# Altium PCB MiniPC.PcbDoc (part 18 of 24)
Units mm, origin at the board's own origin, x right, y up, seen from the top; angles counter-clockwise.
Board outline 175 x 155 mm, 16 copper layers (1_Top, 2_int1_(gnd), 3_int2_(power), 4_int3_(gnd), 5_int4_(sign), 6_int5_(power), 7_int6_(sign), 8_int7_(power), 9_int8_(gnd), 10_int9_(sign), 11_int10_(gnd), 12_int11_(sign), 13_int12_(gnd), 14_int13_(power), 15_int14_(gnd), 16_Bottom), stack 2.008 mm thick; 1046 components, 837 nets, 6010 pads, 4009 vias.
Unrouted connection lines stored in the file: 564.
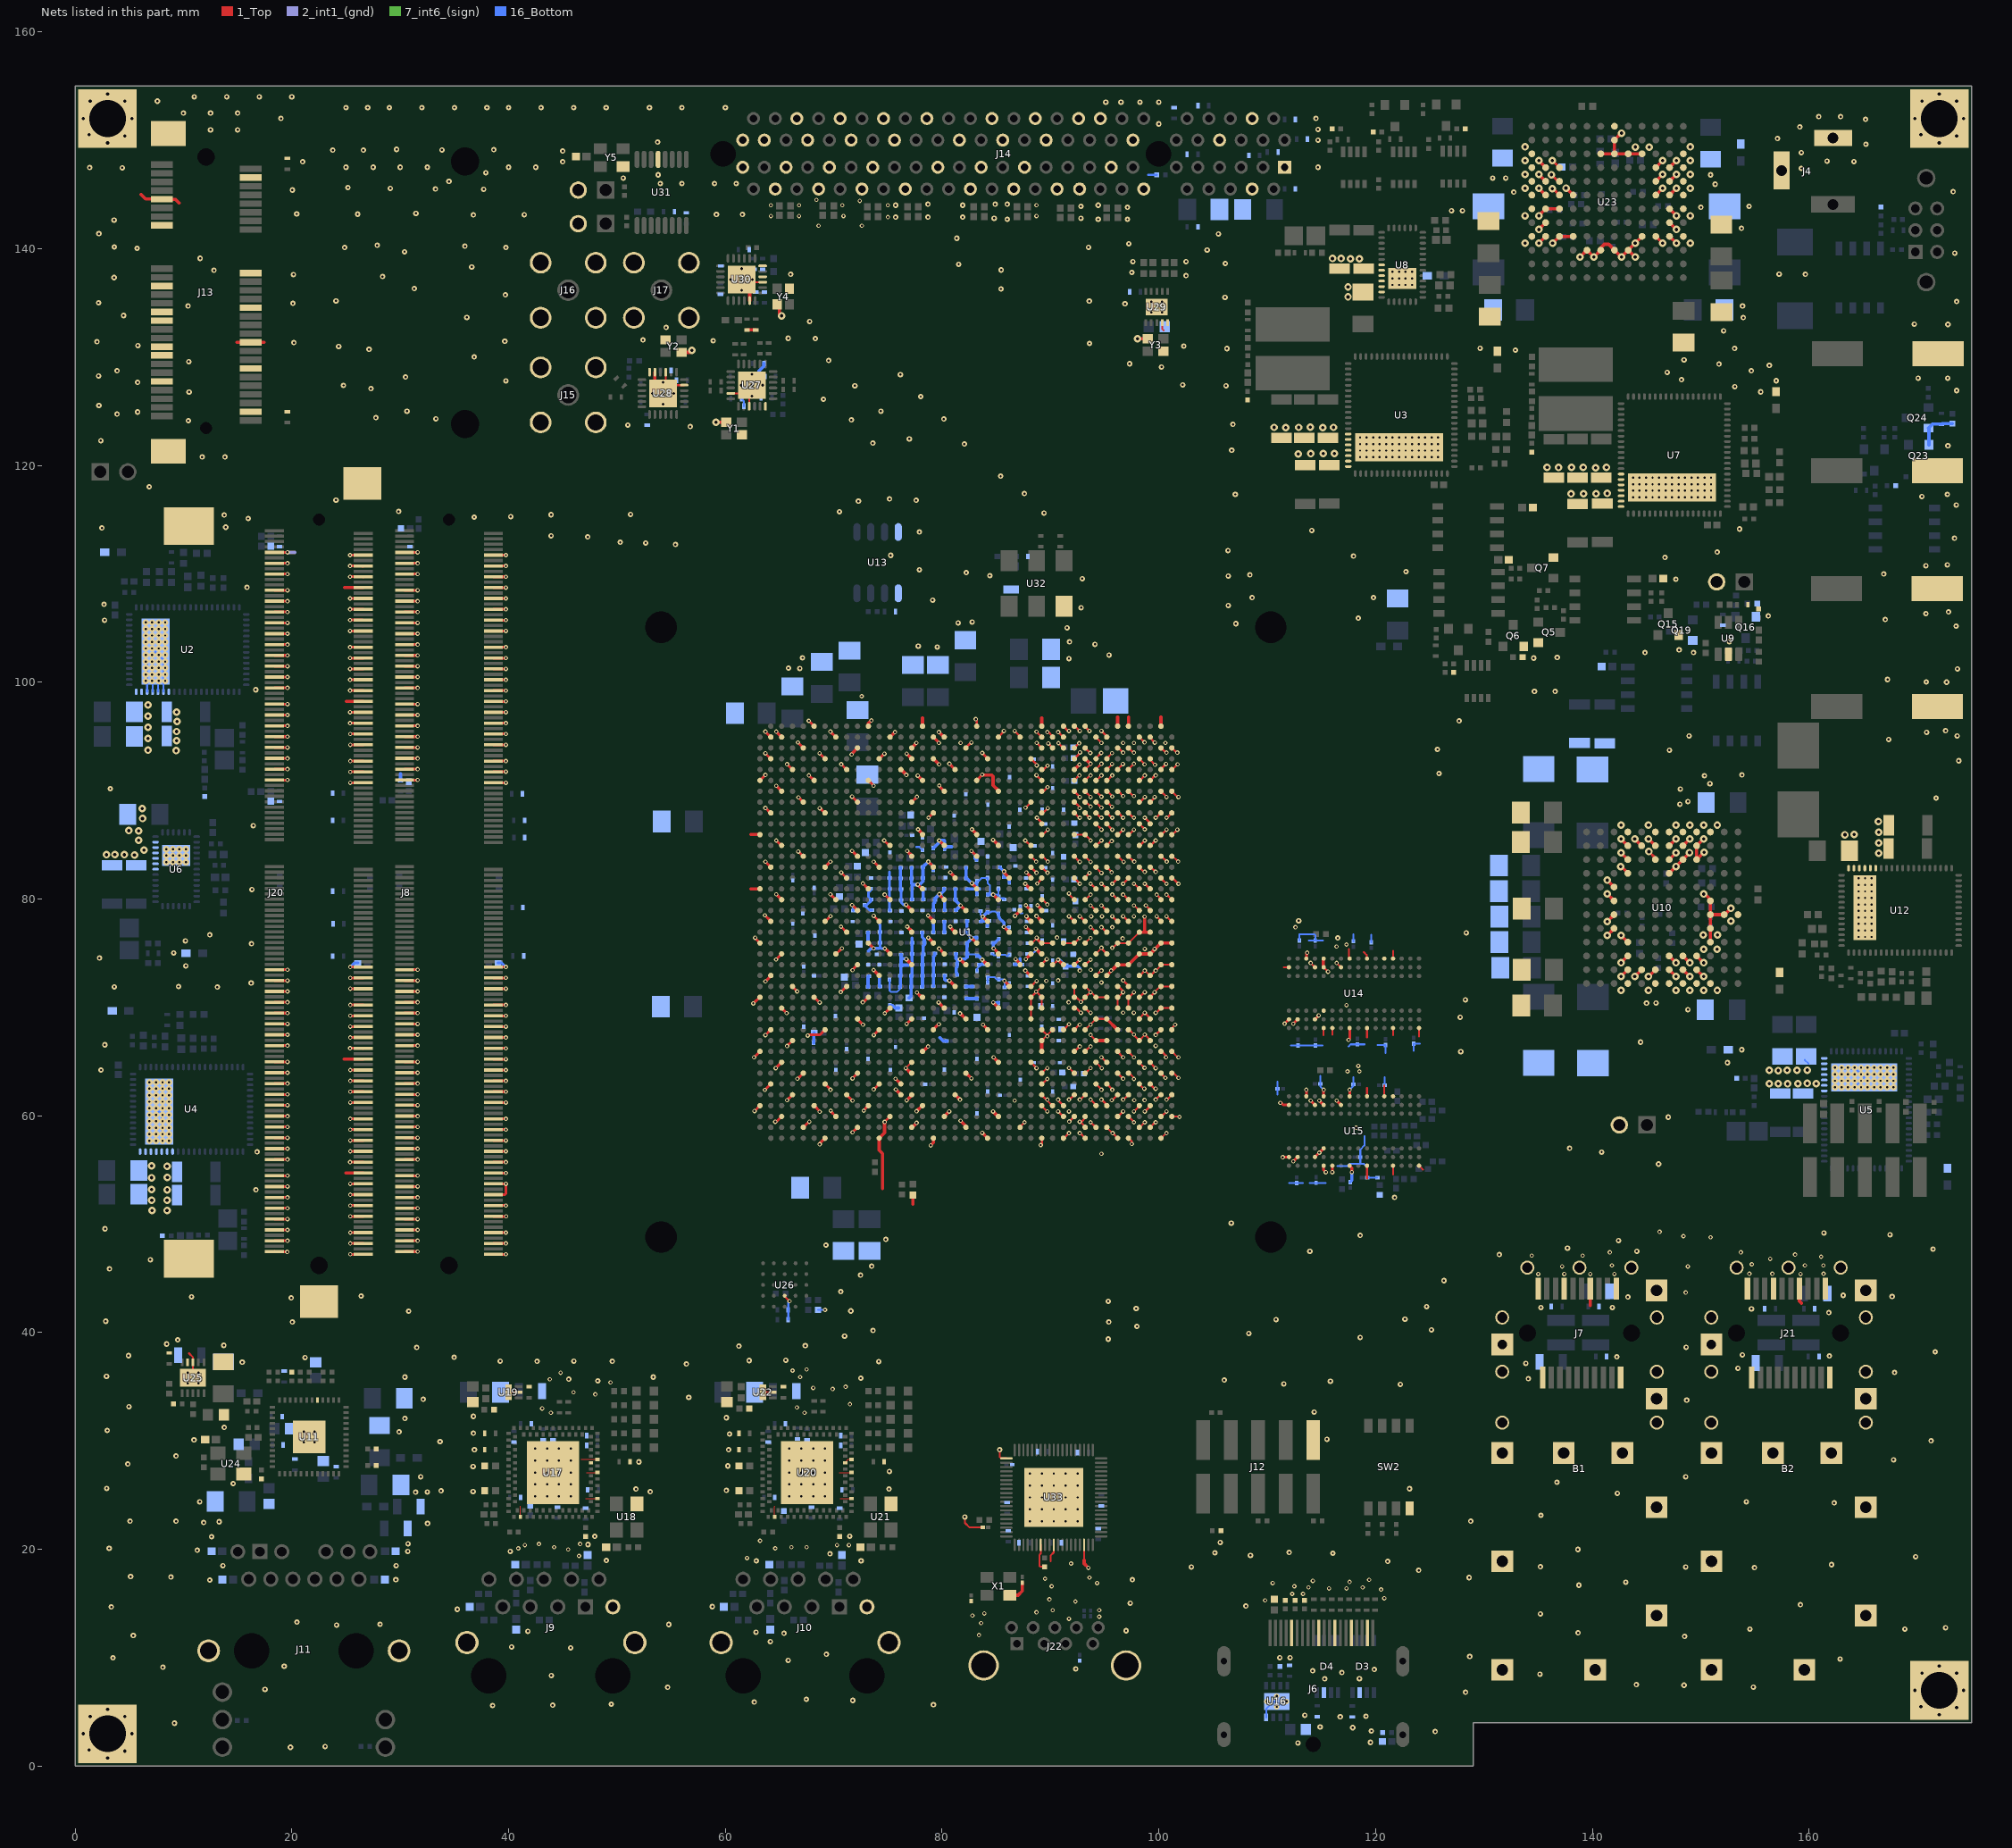
[diagram p30: the nets of this part, all layers, seen from the top]

## Via types
v1: diameter 0.4, hole 0.2, 1_Top to 16_Bottom, tented both sides, 1658 vias
v2: diameter 0.5, hole 0.2, 1_Top to 16_Bottom, tented both sides, 1014 vias
v3: diameter 0.7, hole 0.3, 1_Top to 16_Bottom, tented both sides, 915 vias
v4: diameter 0.6, hole 0.2, 1_Top to 16_Bottom, tented both sides, 278 vias
v5: diameter 0.4, hole 0.2, 1_Top to 16_Bottom, 93 vias
v6: diameter 0.4/0/0/0/0/0/0/0/0/0/0/0/0/0/0/0.4 (per signal layer), hole 0.2, 1_Top to 16_Bottom, tented both sides, 18 vias
v7: diameter 0.4/0/0/0/0/0/0/0/0/0/0/0.4/0.4/0.4/0.4/0.4 (per signal layer), hole 0.2, 1_Top to 16_Bottom, tented both sides, 16 vias
v8: diameter 0.5, hole 0.254, 1_Top to 16_Bottom, tented both sides, 15 vias
v9: diameter 0.5, hole 0.2, 1_Top to 16_Bottom, 2 vias

## Nets (pads, with @x,y where several pads share a name; then routed paths per layer and width w, separated by ;. In a path a pad name is that pad's centre, name@x,y a point inside that pad or via, vN(x,y) a via of type N, cw(c..) or ccw(c..) an arc to the next point about the centre after c; other vN are vias at no path point) (continued)
GND: B1.MH1 B1.MH2 B1.MH3 B1.MH4 B1.MH5 B1.MH6 B1.MH7 B1.MH8 B1.MH9 B1.MH10 B1.MH11 B1.MH12 B1.MH13 B1.MH14 B1.MH15 B1.MH16 B1.MH17 B1.MH18 B1.MH19 B1.MH20 B2.MH1 B2.MH2 B2.MH3 B2.MH4 B2.MH5 B2.MH6 B2.MH7 B2.MH8 B2.MH9 B2.MH10 B2.MH11 B2.MH12 B2.MH13 B2.MH14 B2.MH15 B2.MH16 B2.MH17 B2.MH18 B2.MH19 B2.MH20 C2.1 C3.1 C9.1 C10.1 C11.1 C12.1 C18.1 C19.1 C20.1 C21.1 C22.1 C28.1 C29.1 C30.1 C31.1 C37.1 C38.1 C39.1 C40.1 C45.1 C46.1 C47.1 C52.1 C53.1 C54.1 C55.1 C56.1 C61.1 C62.1 C63.1 C67.1 C68.1 C69.1 C70.1 C71.1 C72.1 C74.2 C75.2 C76.2 C77.2 C79.1 C80.2 C81.2 C82.1 C83.1 C84.1 C85.1 C86.1 C87.2 C88.2 C89.1 C90.1 C91.1 C92.1 C93.1 C95.2 C96.1 C97.1 C98.1 C99.1 C100.1 C101.2 C102.1 C103.1 C104.1 C105.1 C112.1 C113.1 C116.1 C118.1 C119.1 C120.1 C121.1 C122.1 C123.1 C124.1 C125.1 C126.1 C127.1 C128.1 C129.1 C130.1 C131.1 C132.1 C133.1 C134.1 C135.1 C136.1 C137.1 C138.1 C139.1 C140.1 C141.1 C142.1 C143.1 C144.1 C145.1 C146.1 C147.1 C148.1 C149.1 C150.1 C151.1 C152.1 C153.1 C154.1 C155.1 C156.1 C157.1 C158.1 C159.1 C160.1 C161.1 C162.1 C163.1 C164.1 C165.1 C166.1 C167.1 C168.1 C169.1 C170.1 C171.1 C172.1 C173.1 C174.1 C175.1 C176.1 C177.1 C178.1 C179.1 C180.1 C181.1 C182.1 C183.1 C184.1 C185.1 C186.1 C187.1 C188.1 C189.1 C190.1 C191.1 C192.1 C193.1 C194.1 C195.1 C196.1 C197.1 C198.1 C199.1 C200.1 C201.1 C202.1 C203.1 C204.1 C205.1 C206.1 C207.1 C208.1 C209.1 C210.1 C211.1 C212.1 C213.1 C214.1 C215.1 C216.1 C217.1 C218.1 C219.1 C220.1 C221.1 C222.1 C223.1 C224.1 C225.1 C226.1 C227.1 C228.1 C229.1 C230.1 C231.1 C232.1 C233.1 C234.1 C235.1 C236.1 C237.1 C238.1 C239.1 C240.1 C241.1 C242.1 C243.1 C244.1 C245.1 C246.1 C247.1 C248.1 C249.1 C250.1 C251.1 C252.1 C253.1 C254.1 C255.1 C256.1 C257.1 C258.1 C259.1 C260.1 C261.1 C262.1 C263.1 C264.1 C265.1 C266.1 C267.1 C268.1 C269.1 C270.1 C271.1 C272.1 C273.1 C274.1 C275.1 C276.1 C277.1 C278.1 C279.1 C280.1 C281.1 C282.1 C283.2 C284.2 C285.2 C286.2 C287.2 C288.1 C289.2 C290.2 C291.2 C292.2 C293.2 C294.2 C295.2 C296.2 C297.2 C298.1 C299.1 C300.1 C308.1 C310.2 C311.2 C312.2 C314.2 C318.1 C319.1 C320.1 C321.1 C322.1 C323.1 C324.1 C325.1 C326.1 C327.1 C328.1 C329.1 C330.1 C331.1 C332.1 C333.1 C334.1 C335.1 C336.2 C337.2 C338.2 C340.2 C344.1 C345.1 C346.1 C347.1 C348.1 C349.1 C350.1 C351.1 C352.1 C353.1 C354.1 C355.1 C356.1 C357.1 C358.1 C359.1 C360.1 C361.1 C362.1 C363.1 C364.1 C365.1 C366.1 C367.1 C368.1 C369.1 C370.1 C371.1 C372.1 C373.1 C374.1 C375.1 C376.1 C377.1 C378.1 C379.1 C380.1 C381.1 C382.1 C383.1 C384.1 C385.1 C386.1 C387.2 C388.1 C389.1 C390.2 C391.1 C392.1 C393.1 C394.1 C395.1 C396.1 C397.1 C398.1 C399.1 C400.1 C401.1 C402.1 C403.1 C404.1 C405.1 C406.1 C407.1 C408.1 C409.1 C410.1 C411.1 C412.1 C413.1 C414.1 C415.1 C416.1 C417.1 C418.1 C419.1 C420.1 C421.1 C422.1 C423.1 C424.1 C425.1 C426.1 C427.1 C428.1 C429.1 C430.1 C431.1 C432.1 C433.1 C434.1 C435.1 C436.1 C437.1 C438.1 C439.1 C440.1 C441.1 C442.1 C443.1 C444.1 C445.1 C446.1 C447.1 C448.1 C449.1 C450.1 C451.1 C452.1 C453.1 C454.1 C455.1 C456.1 C457.1 C458.1 C459.1 C460.1 C461.1 C462.1 C463.1 C464.1 C465.1 C466.1 C467.1 C468.1 C469.1 C470.1 C471.1 C472.1 C473.1 C474.1 C475.1 C476.1 C477.1 C478.1 C479.1 C480.1 C481.1 C482.2 C483.1 C500.1 C501.1 C502.1 C503.1 C504.1 C505.1 C506.1 C507.1 C508.1 C509.1 C510.2 C511.2 C512.2 C513.2 C514.2 C515.2 C525.2 C526.2 C527.2 C528.2 C529.2 C530.2 C532.1 C533.1 C534.1 C535.1 C536.1 C537.1 C538.1 C539.1 C540.1 C541.1 C542.1 C543.1 C546.1 C547.1 C548.1 C549.1 C550.1 C551.1 C552.1 C553.1 C554.1 C555.1 C556.1 C557.1 C558.1 C559.1 C562.1 C563.1 C564.1 C565.1 C566.1 C567.1 C568.1 C569.2 C570.1 C571.1 C572.1 C573.1 C574.1 D3.7 D4.7 J3.2 J4.2 J4.3 J5.2 J6.2 J6.5 J6.8 J6.11 J6.16 J7.1 J7.10 J7.11 J7.14 J7.17 J7.20 J8.1 J8.2 J8.5 J8.6 J8.9 J8.10 J8.14 J8.15 J8.18 J8.19 J8.22 J8.23 J8.26 J8.27 J8.30 J8.31 J8.35 J8.36 J8.39 J8.40 J8.43 J8.44 J8.47 J8.48 J8.51 J8.52 J8.56 J8.57 J8.60 J8.61 J8.64 J8.65 J8.68 J8.69 J8.72 J8.73 J8.77 J8.78 J8.81 J8.82 J8.85 J8.86 J8.89 J8.90 J8.93 J8.94 J8.98 J8.99 J8.102 J8.103 J8.106 J8.107 J8.167 J8.168 J8.171 J8.172 J8.175 J8.176 J8.180 J8.181 J8.184 J8.185 J8.188 J8.189 J8.192 J8.193 J8.196 J8.197 J8.201 J8.202 J8.205 J8.206 J8.209 J8.210 J8.213 J8.214 J8.217 J8.218 J8.222 J8.223 J8.226 J8.227 J8.230 J8.231 J8.234 J8.235 J8.238 J8.239 J8.243 J8.244 J8.247 J8.248 J8.251 J8.252 J8.MP1 J8.MP2 J9.10 J9.S1 J9.S2 J10.10 J10.S1 J10.S2 J11.S1 J11.S2 J12.10 J13.4 J13.9 J13.15 J13.18 J13.21 J13.26 J13.27 J13.29 J13.34 J13.35 J13.37 J13.40 J13.43 J13.50 J13.MP1 J13.MP2 J14.A1 J14.A4 J14.A12 J14.A15 J14.A18 J14.A20 J14.A23 J14.A24 J14.A27 J14.A28 J14.A31 J14.A34 J14.A37 J14.A38 J14.A41 J14.A42 J14.A45 J14.A46 J14.A49 J14.B4 J14.B7 J14.B13 J14.B16 J14.B18 J14.B21 J14.B22 J14.B25 J14.B26 J14.B29 J14.B32 J14.B35 J14.B36 J14.B39 J14.B40 J14.B43 J14.B44 J14.B47 J14.B49 J15.2 J15.3 J15.4 J15.5 J16.2 J16.3 J16.4 J16.5 J17.2 J17.3 J17.4 J17.5 J18.2 J19.2 J20.1 J20.2 J20.5 J20.6 J20.9 J20.10 J20.14 J20.15 J20.18 J20.19 J20.22 J20.23 J20.26 J20.27 J20.30 J20.31 J20.35 J20.36 J20.39 J20.40 J20.43 J20.44 J20.47 J20.48 J20.51 J20.52 J20.56 J20.57 J20.60 J20.61 J20.64 J20.65 J20.68 J20.69 J20.72 J20.73 J20.77 J20.78 J20.81 J20.82 J20.85 J20.86 J20.89 J20.90 J20.93 J20.94 J20.98 J20.99 J20.102 J20.103 J20.106 J20.107 J20.167 J20.168 J20.171 J20.172 J20.175 J20.176 J20.180 J20.181 J20.184 J20.185 J20.188 J20.189 J20.192 J20.193 J20.196 J20.197 J20.201 J20.202 J20.205 J20.206 J20.209 J20.210 J20.213 J20.214 J20.217 J20.218 J20.222 J20.223 J20.226 J20.227 J20.230 J20.231 J20.234 J20.235 J20.238 J20.239 J20.243 J20.244 J20.247 J20.248 J20.251 J20.252 J20.MP1 J20.MP2 J21.1 J21.10 J21.11 J21.14 J21.17 J21.20 J22.10 J22.11 L1.1 L2.1 L3.1 L4.1 L5.1 L6.1 L7.1 L8.1 L9.1 L10.1 MH1.MH1 MH2.MH1 MH3.MH1 MH4.MH1 Q5.2 Q6.2 Q7.2 Q15.2 Q16.2 Q19.2 Q23.2 Q24.2 R3.1 R9.1 R16.1 R17.1 R20.1 R30.1 R40.1 R58.1 R72.1 R94.1 R119.1 R121.1 R131.1 R137.1 R140.1 R157.2 R184.2 R185.2 R186.2 R187.2 R188.2 R189.2 R190.2 R191.2 R192.2 R193.2 R194.1 R223.1 R228.1 R230.1 R231.1 R233.1 R235.1 R236.1 R237.1 R243.2 R244.1 R245.1 R246.1 R247.1 R248.1 R257.1 R258.1 R264.2 R265.2 R272.1 R281.1 R282.1 R288.2 R289.2 R295.1 R299.2 R304.2 R307.2 R309.2 R315.1 R322.1 R323.1 R328.1 R332.2 R342.2 SW2.8 U1.A6 U1.A11 U1.A16 U1.A21 U1.A27 U1.A29 U1.A30 U1.A31 U1.A34 U1.A35 U1.A38 U1.AA1 U1.AA11 U1.AA17 U1.AA21 U1.AA26 U1.AA27 U1.AA28 U1.AA29 U1.AA30 U1.AA31 U1.AA34 U1.AA35 U1.AA38 U1.AA39 U1.AB3 U1.AB8 U1.AB13 U1.AB18 U1.AB23 U1.AB26 U1.AB27 U1.AB32 U1.AB33 U1.AB36 U1.AB37 U1.AC10 U1.AC15 U1.AC20 U1.AC22 U1.AC25 U1.AC27 U1.AC28 U1.AC29 U1.AC30 U1.AC31 U1.AC34 U1.AC35 U1.AC38 U1.AC39 U1.AD2 U1.AD12 U1.AD26 U1.AD32 U1.AD33 U1.AD36 U1.AD37 U1.AE4 U1.AE9 U1.AE19 U1.AE24 U1.AE26 U1.AE27 U1.AE30 U1.AE31 U1.AE34 U1.AE35 U1.AE38 U1.AE39 U1.AF1 U1.AF6 U1.AF11 U1.AF16 U1.AF26 U1.AF27 U1.AF30 U1.AF31 U1.AF32 U1.AF33 U1.AF34 U1.AF35 U1.AF36 U1.AF37 U1.AG3 U1.AG13 U1.AG18 U1.AG23 U1.AG26 U1.AG27 U1.AG30 U1.AG31 U1.AG34 U1.AG35 U1.AG38 U1.AG39 U1.AH10 U1.AH15 U1.AH20 U1.AH26 U1.AH32 U1.AH33 U1.AH36 U1.AH37 U1.AJ2 U1.AJ7 U1.AJ12 U1.AJ17 U1.AJ22 U1.AJ27 U1.AJ28 U1.AJ29 U1.AJ30 U1.AJ31 U1.AJ34 U1.AJ35 U1.AJ38 U1.AJ39 U1.AK4 U1.AK27 U1.AK32 U1.AK33 U1.AK36 U1.AK37 U1.AL1 U1.AL16 U1.AL27 U1.AL30 U1.AL31 U1.AL34 U1.AL35 U1.AL38 U1.AL39 U1.AM3 U1.AM15 U1.AM23 U1.AM26 U1.AM32 U1.AM33 U1.AM36 U1.AM37 U1.AN5 U1.AN10 U1.AN15 U1.AN20 U1.AN27 U1.AN30 U1.AN31 U1.AN34 U1.AN35 U1.AN38 U1.AN39 U1.AP2 U1.AP7 U1.AP12 U1.AP14 U1.AP27 U1.AP32 U1.AP33 U1.AP36 U1.AP37 U1.AR4 U1.AR9 U1.AR14 U1.AR15 U1.AR19 U1.AR27 U1.AR30 U1.AR31 U1.AR34 U1.AR35 U1.AR38 U1.AR39 U1.AT1 U1.AT6 U1.AT11 U1.AT16 U1.AT27 U1.AT28 U1.AT29 U1.AT32 U1.AT33 U1.AT36 U1.AT37 U1.AU3 U1.AU8 U1.AU13 U1.AU18 U1.AU23 U1.AU29 U1.AU30 U1.AU31 U1.AU34 U1.AU35 U1.AU38 U1.AU39 U1.AV5 U1.AV10 U1.AV15 U1.AV20 U1.AV25 U1.AV31 U1.AV32 U1.AV33 U1.AV36 U1.AV37 U1.AW7 U1.AW12 U1.AW17 U1.AW22 U1.AW27 U1.AW29 U1.AW31 U1.AW34 U1.AW35 U1.AW38 U1.B2 U1.B3 U1.B8 U1.B13 U1.B17 U1.B18 U1.B23 U1.B25 U1.B27 U1.B28 U1.B29 U1.B32 U1.B33 U1.B36 U1.B37 U1.C5 U1.C10 U1.C15 U1.C20 U1.C27 U1.C28 U1.C29 U1.C30 U1.C31 U1.C34 U1.C35 U1.C38 U1.C39 U1.D2 U1.D7 U1.D12 U1.D15 U1.D17 U1.D22 U1.D26 U1.D30 U1.D31 U1.D32 U1.D33 U1.D36 U1.D37 U1.E4 U1.E9 U1.E14 U1.E19 U1.E27 U1.E30 U1.E31 U1.E32 U1.E33 U1.E34 U1.E35 U1.E38 U1.E39 U1.F1 U1.F6 U1.F11 U1.F16 U1.F21 U1.F27 U1.F30 U1.F31 U1.F32 U1.F33 U1.F36 U1.F37 U1.G3 U1.G18 U1.G23 U1.G27 U1.G30 U1.G31 U1.G32 U1.G33 U1.G34 U1.G35 U1.G38 U1.G39 U1.H5 U1.H10 U1.H15 U1.H26 U1.H30 U1.H31 U1.H32 U1.H33 U1.H36 U1.H37 U1.J2 U1.J7 U1.J17 U1.J27 U1.J30 U1.J31 U1.J32 U1.J33 U1.J34 U1.J35 U1.J38 U1.J39 U1.K27 U1.K32 U1.K33 U1.K36 U1.K37 U1.L1 U1.L16 U1.L21 U1.L27 U1.L30 U1.L31 U1.L34 U1.L35 U1.L38 U1.L39 U1.M3 U1.M13 U1.M18 U1.M23 U1.M26 U1.M32 U1.M33 U1.M36 U1.M37 U1.N5 U1.N10 U1.N15 U1.N21 U1.N26 U1.N27 U1.N30 U1.N31 U1.N34 U1.N35 U1.N38 U1.N39 U1.P2 U1.P7 U1.P12 U1.P17 U1.P26 U1.P27 U1.P32 U1.P33 U1.P36 U1.P37 U1.R9 U1.R19 U1.R24 U1.R26 U1.R27 U1.R30 U1.R31 U1.R34 U1.R35 U1.R38 U1.R39 U1.T1 U1.T11 U1.T16 U1.T21 U1.T26 U1.T32 U1.T33 U1.T36 U1.T37 U1.U3 U1.U8 U1.U13 U1.U18 U1.U23 U1.U27 U1.U30 U1.U31 U1.U34 U1.U35 U1.U38 U1.U39 U1.V10 U1.V15 U1.V20 U1.V25 U1.V26 U1.V27 U1.V32 U1.V33 U1.V36 U1.V37 U1.W2 U1.W7 U1.W12 U1.W17 U1.W22 U1.W26 U1.W27 U1.W30 U1.W31 U1.W34 U1.W35 U1.W38 U1.W39 U1.Y9 U1.Y15 U1.Y19 U1.Y24 U1.Y26 U1.Y32 U1.Y33 U1.Y36 U1.Y37 U2.28 U2.29 U2.30 U2.31 U2.32 U2.33 U2.34 U2.69 U3.32 U3.33 U3.34 U3.35 U3.36 U3.37 U3.38 U3.77 U4.28 U4.29 U4.30 U4.31 U4.32 U4.33 U4.34 U4.69 U5.28 U5.29 U5.30 U5.31 U5.32 U5.33 U5.34 U5.69 U6.13 U6.14 U6.15 U6.16 U6.17 U6.18 U6.39 U7.32 U7.33 U7.34 U7.35 U7.36 U7.37 U7.38 U7.77 U8.13 U8.14 U8.15 U8.16 U8.17 U8.18 U8.39 U9.2 U10.A4 U10.A6 U10.A7 U10.A8 U10.A9 U10.A10 U10.B4 U10.B5 U10.B6 U10.B7 U10.B8 U10.B9 U10.C4 U10.C6 U10.C7 U10.C8 U10.C9 U10.D4 U10.D7 U10.E3 U10.F3 U10.F10 U10.G3 U10.G10 U10.G11 U10.G12 U10.H3 U10.H10 U10.J4 U10.J10 U10.K4 U10.K7 U10.K8 U10.K9 U10.L4 U10.L5 U10.L6 U10.L7 U10.L8 U10.L9 U10.M4 U10.M6 U10.M7 U10.M8 U10.M9 U10.M10 U11.29 U11.49 U12.29 U12.30 U12.31 U12.32 U12.33 U12.34 U12.69 U13.4 U13.5 U14.A2 U14.A8 U14.B2 U14.C9 U14.D2 U14.D8 U14.E1 U14.E3 U14.E8 U14.E9 U14.F1 U14.G8 U14.H1 U14.H9 U14.K1 U14.K9 U14.M9 U14.N1 U14.N9 U14.T1 U15.A2 U15.A8 U15.B2 U15.C9 U15.D2 U15.D8 U15.E1 U15.E3 U15.E8 U15.E9 U15.F1 U15.G8 U15.H1 U15.H9 U15.K1 U15.K9 U15.M9 U15.N1 U15.N9 U15.T1 U16.8 U16.9 U17.A15 U17.A29 U17.A33 U17.A35 U17.B30 U17.B45 U18.2 U19.2 U19.7 U20.A15 U20.A29 U20.A33 U20.A35 U20.B30 U20.B45 U21.2 U22.2 U22.7 U23.A4 U23.A6 U23.A7 U23.A8 U23.A9 U23.A10 U23.B4 U23.B5 U23.B6 U23.B7 U23.B8 U23.B9 U23.C4 U23.C6 U23.C7 U23.C8 U23.C9 U23.D4 U23.D7 U23.E3 U23.F3 U23.F10 U23.G3 U23.G10 U23.G11 U23.G12 U23.H3 U23.H10 U23.J4 U23.J10 U23.K4 U23.K7 U23.K8 U23.K9 U23.L4 U23.L5 U23.L6 U23.L7 U23.L8 U23.L9 U23.M4 U23.M6 U23.M7 U23.M8 U23.M9 U23.M10 U24.2 U25.3 U25.4 U25.11 U26.B3 U27.3 U27.6 U27.23 U27.25 U28.3 U28.5 U28.6 U28.23 U28.25 U29.4 U29.5 U29.11 U30.3 U30.4 U30.6 U30.23 U30.25 U31.5 U32.3 U33.1 U33.26 U33.29 U33.36 U33.77 X1.2 Y1.2 Y1.4 Y2.2 Y2.4 Y3.2 Y3.4 Y4.2 Y4.4 Y5.2 | length 871.6
  1_Top w0.1: U17.A15@41.1,23 41.1,24 ; 46.7,28.3 U17.A35@48.2,28.3 ; 47.1,24.7 U17.A29@48.2,24.7 ; 47.2,27.1 U17.A33@48.2,27.1 ; 64.5,24 64.55,23.95 U20.A15@64.55,23 ; 70.5,27.1 U20.A33@71.65,27.1 ; 70.6,24.7 U20.A29@71.65,24.7 ; U20.B30@71.05,28 71.35,28.3 U20.A35@71.65,28.3
  1_Top w0.17: 10.5,38.1 10.887,37.713 U25.3@10.887,37.25 U25.11@10.887,35.825 ; v8(54.25,126.65) U28.25@54.5,126.9 ; U28.3@54.5,128.6 U28.25@54.5,126.9 ; U28.23@56.2,127.4 55,127.4 U28.25@54.5,126.9 ; U27.23@60.5,126.65 61.7,126.65 U27.25@62.2,127.15 ; v8(61.495,137.15) 61.745,136.9 U30.3@63.445,136.9 ; U27.3@62.2,125.45 U27.25@62.2,127.15 ; v8(62.45,127.4) U27.25@62.2,127.15 ; v1(76.65,64.4) 77.189,64.939 U1.AM15@77.194,64.939 ; v2(82.1,23) 82,23 82.1,22.9 82.1,22.45 82.525,22.025 C563.1@83.74,22.025 ; v2(85.3,29.2) 85.3,28.55 85.45,28.4 U33.1@85.925,28.4 ; U1.AV25@87.194,58.939 87.194,58.994 v1(87.6,59.4) ; U1.AH26@88.194,68.939 U1.AG26@88.194,69.939 U1.AF26@88.194,70.939 ; U1.AA26@88.194,75.939 88.314,75.939 v1@88.725,76.35 ; v1(88.679,71.453) 88.692,71.453 88.708,71.453 U1.AE27@89.194,71.939 ; v1@88.694,71.439 89.194,70.939 U1.AG27@89.194,69.939 ; U33.26@89.1,20.425 89.1,19.607 89.015,19.522 89.015,19.515 89,19.5 89,18.475 89.075,18.4 R342.2@89.475,18.4 ; U1.AK27@89.194,66.939 89.655,67.4 v1(89.71,67.345) 89.71,67.423 89.7,67.433 89.7,67.445 U1.AJ28@90.194,67.939 ; U1.AA27@89.194,75.939 U1.AA28@90.194,75.939 ; 90,18.925 90,19.429 90.3,19.729 U33.29@90.3,20.425 ; U1.AA29@91.194,75.939 U1.AA30@92.194,75.939 ; U1.AF30@92.194,70.939 U1.AE30@92.194,71.939 ; U1.L30@92.194,85.939 U1.L31@93.194,85.939 ; v1(92.8,70.5) 93.194,70.894 U1.AF31@93.194,70.939 ; 93.1,19 U33.36@93.1,20.425 ; U1.AE31@93.194,71.939 93.7,71.433 v1(93.7,71.4) 93.733,71.4 U1.AF32@94.194,70.939 U1.AF33@95.194,70.939 ; v1@93.655,68.4 U1.AH32@94.194,68.939 U1.AH33@95.194,68.939 ; U1.AB32@94.194,74.939 94.206,74.939 v1@94.7,75.433 ; U1.AV33@95.194,58.939 v1(95.733,58.4) ; U1.AG34@96.194,69.939 U1.AF34@96.194,70.939 96.239,70.939 v1(96.7,71.4) ; U1.AA34@96.194,75.939 U1.AA35@97.194,75.939 U1.Y36@98.194,76.939 ; U1.AG35@97.194,69.939 U1.AF35@97.194,70.939 ; v1(97.7,67.5) 97.7,67.433 U1.AK36@98.194,66.939 98.7,67.445 v1(98.7,67.5) ; U1.AV36@98.194,58.939 98.239,58.939 v1(98.7,59.4) ; U1.AH36@98.194,68.939 98.194,68.994 v1(98.7,69.5) ; v1(98.7,73.4) 98.733,73.4 U1.AD37@99.194,72.939 ; U1.AV37@99.194,58.939 99.655,59.4 v1(99.7,59.4) ; v1(99.6,71.4) 100.139,71.939 U1.AE38@100.194,71.939 U1.AE39@101.194,71.939 ; v1(99.7,73.4) 100.194,73.894 U1.AC38@100.194,73.939 U1.AC39@101.194,73.939 ; U1.AW38@100.194,57.939 100.655,58.4 v1(100.7,58.4) ; U1.AG38@100.194,69.939 U1.AG39@101.194,69.939 ; U29.4@100.3,133.175 100.3,132.6 100.45,132.45 ; 111.5,73.7 U14.A8@112,73.7 ; v1(114,74.1) U14.D8@114.4,73.7 ; 115.2,67.45 U14.E1@115.2,68.1 ; U14.E8@115.2,73.7 v1(115.6,73.3) ; 116,67.475 U14.F1@116,68.1 ; v1(116.4,74.1) U14.G8@116.8,73.7 ; 117.515,75.385 117.515,74.585 U14.H9@117.6,74.5 ; 118.9,75.1 119.165,74.835 119.165,74.535 U14.K9@119.2,74.5 ; 119.2,54.2 U15.K1@119.2,55.4 ; U15.K9@119.2,61.8 119.2,62.575 ; 119.2,67.25 U14.K1@119.2,68.1 ; U15.M9@120.8,61.8 120.8,62.8 ; 121.6,54.6 U15.N1@121.6,55.4 ; 121.6,67.45 U14.N1@121.6,68.1 ; U14.N9@121.6,74.5 121.6,75.225 ; U15.T1@124,55.4 124.35,55.05 ; 124,67.3 U14.T1@124,68.1
  1_Top w0.2: U19.7@40,34.5 U19.2@40.925,34.5 ; U22.7@63.45,34.5 U22.2@64.375,34.5 ; U26.B3@65.475,43.4 65.475,43.325 65.9,42.9 v1(65.925,42.9) ; v1(83.1,96.6) 83.194,96.506 U1.A21@83.194,95.939 ; U1.B23@85.194,94.939 85.7,95.445 v1(85.7,95.5) ; v1(86.7,95.5) 87.194,95.006 U1.B25@87.194,94.939 ; v1(87.675,85.4) 88.136,84.939 U1.M26@88.194,84.939 ; v1(87.7,88.425) 88.194,88.919 U1.H26@88.194,88.939 ; U1.AM26@88.194,64.939 88.7,64.433 v1(88.7,64.4) ; U1.AF26@88.194,70.939 88.694,71.439 88.7,71.445 v1@88.692,71.453 ; U1.AE26@88.194,71.939 88.7,72.445 v1(88.72,72.425) ; U1.P26@88.194,82.939 88.194,82.931 v1(88.7,82.425) ; U1.N26@88.194,83.939 88.675,83.458 v1(88.675,83.45) ; U1.D26@88.194,92.939 88.725,92.408 v1(88.725,92.325) ; v1(88.7,91.425) 88.708,91.425 U1.F27@89.194,90.939 ; v1(88.7,95.433) U1.B27@89.194,94.939 ; v1(88.725,94.4) 89.186,93.939 U1.C27@89.194,93.939 ; v1(88.75,87.5) 89.194,87.056 U1.K27@89.194,86.939 ; v1(88.775,81.425) 89.194,81.844 U1.R27@89.194,81.939 ; v1(89.1,57.3) 89.194,57.394 U1.AW27@89.194,57.939 ; U1.E27@89.111,91.939 U1.E27@89.194,91.939 89.364,91.939 v1(89.725,92.3) ; U1.AT27@89.194,60.939 89.194,60.906 v1(89.7,60.4) ; U1.AR27@89.194,61.939 89.194,61.906 89.6,61.5 v1(89.7,61.5) 89.7,61.4 90.161,60.939 U1.AT28@90.194,60.939 ; U1.AP27@89.194,62.939 89.239,62.939 v1(89.7,63.4) ; U1.AN27@89.194,63.939 89.665,64.41 89.675,64.4 v1(89.7,64.4) ; U1.AJ27@89.194,67.939 v1@89.7,67.433 ; U1.AC27@89.194,73.939 89.194,73.994 v1(89.65,74.45) ; U1.U27@89.194,79.939 89.261,79.939 v1(89.7,79.5) ; U1.P27@89.194,82.939 89.708,82.425 v1(89.725,82.425) ; U1.N27@89.194,83.939 89.261,83.939 v1(89.75,83.45) ; U1.L27@89.194,85.939 89.289,85.939 v1(89.75,86.4) ; U1.J27@89.194,87.939 89.314,87.939 v1(89.75,88.375) ; U1.G27@89.194,89.939 89.339,89.939 v1(89.725,90.325) ; v1(89.7,95.4) 89.8,95.4 90.194,95.006 U1.B28@90.194,94.939 ; v1(89.8,94.35) 89.8,94.333 U1.C28@90.194,93.939 ; U1.AJ28@90.194,67.894 U1.AJ28@90.194,67.939 ; U1.AC28@90.194,73.939 90.239,73.939 v1(90.7,74.4) ; v1(90.7,60.4) 91.161,59.939 U1.AU29@91.194,59.939 ; v1(90.7,61.5) 90.7,61.433 U1.AT29@91.194,60.939 ; v1@90.7,95.4 91.161,94.939 U1.B29@91.194,94.939 ; v1(90.73,94.38) 90.73,94.37 91.161,93.939 U1.C29@91.194,93.939 ; U1.AW29@91.194,57.939 91.239,57.939 v1(91.7,58.4) ; U1.AJ29@91.194,67.939 v1(91.7,68.445) ; U1.A29@91.194,95.939 91.633,95.5 v1(91.7,95.5) ; v1(91.7,61.5) 91.755,61.5 U1.AR30@92.194,61.939 ; v1(91.7,64.41) 91.723,64.41 U1.AN30@92.194,63.939 ; v1(91.7,78.4) 91.733,78.4 U1.W30@92.194,77.939 ; v1(91.7,80.5) 91.7,80.433 U1.U30@92.194,79.939 ; v1(91.735,59.48) U1.AU30@92.194,59.939 ; U1.AL30@92.194,65.939 92.239,65.939 v1(92.7,66.4) ; U1.AJ30@92.194,67.939 92.655,68.4 v1(92.7,68.4) ; U1.AG30@92.194,69.939 92.361,69.939 v1(92.8,69.5) ; U1.AF30@92.194,70.939 92.361,70.939 v1(92.8,70.5) ; U1.AC30@92.194,73.939 92.239,73.939 v1(92.7,74.4) ; U1.AA30@92.194,75.939 92.239,75.939 v1(92.7,76.4) ; U1.R30@92.194,81.939 92.7,81.433 v1(92.7,81.4) ; U1.N30@92.194,83.939 92.7,83.433 v1(92.7,83.425) ; U1.J30@92.194,87.939 92.7,87.433 v1(92.7,87.5) ; U1.H30@92.194,88.939 92.226,88.939 92.68,88.485 v1(92.68,88.379) ; U1.G30@92.194,89.939 92.7,89.433 v1(92.7,89.4) ; U1.F30@92.194,90.939 92.655,91.4 v1(92.675,91.4) ; U1.D30@92.194,92.939 92.725,93.47 v1(92.725,93.525) ; U1.C30@92.194,93.939 92.63,94.375 v1(92.65,94.375) ; U1.A30@92.194,95.939 92.261,95.939 v1(92.7,95.5) ; v1(92.7,58.4) 92.733,58.4 U1.AW31@93.194,57.939 ; v1(92.7,61.5) 92.755,61.5 U1.AR31@93.194,61.939 ; v1(92.7,78.4) 92.733,78.4 U1.W31@93.194,77.939 ; U1.AV31@93.194,58.939 93.194,59.006 92.75,59.45 v1(92.69,59.45) 92.85,59.45 93.194,59.794 U1.AU31@93.194,59.939 ; U1.AN31@93.194,63.939 93.229,63.939 v1(93.7,64.41) ; U1.AL31@93.194,65.939 93.655,66.4 v1(93.7,66.4) ; U1.AJ31@93.194,67.939 v1@93.655,68.4 ; U1.AG31@93.194,69.939 93.633,69.5 v1(93.7,69.5) ; U1.AF31@93.194,70.939 93.655,71.4 v1(93.7,71.4) ; U1.AC31@93.194,73.939 93.239,73.939 v1(93.7,74.4) ; U1.AA31@93.194,75.939 93.655,76.4 v1(93.7,76.4) ; U1.U31@93.194,79.939 93.239,79.939 v1(93.7,80.4) ; U1.R31@93.194,81.939 93.194,81.994 v1(93.6,82.4) ; U1.N31@93.194,83.939 93.194,83.931 v1(93.7,83.425) ; U1.L31@93.194,85.939 93.7,85.433 v1(93.7,85.4) ; U1.J31@93.194,87.939 93.194,87.906 v1(93.6,87.5) ; U1.H31@93.194,88.939 93.286,88.939 v1(93.7,88.525) ; U1.G31@93.194,89.939 93.7,89.433 v1(93.7,89.4) ; U1.F31@93.194,90.939 93.655,91.4 v1(93.7,91.4) ; U1.E31@93.194,91.939 v1@93.7,92.445 ; U1.C31@93.194,93.939 93.658,93.475 v1(93.675,93.475) ; U1.A31@93.194,95.939 93.194,95.906 v1(93.6,95.5) ; v1(93.7,59.4) 94.161,58.939 U1.AV32@94.194,58.939 ; v1(93.7,61.5) 94.194,61.006 U1.AT32@94.194,60.939 ; v1(93.7,67.465) 93.7,67.433 U1.AK32@94.194,66.939 ; v1(93.7,77.4) 93.733,77.4 U1.Y32@94.194,76.939 ; v1(93.7,79.4) 93.733,79.4 U1.V32@94.194,78.939 ; v1(93.7,81.4) 93.733,81.4 U1.T32@94.194,80.939 ; U1.AP32@94.194,62.939 94.7,62.433 v1(94.7,62.4) ; U1.AM32@94.194,64.939 v1(94.733,64.4) ; U1.AD32@94.194,72.939 94.655,73.4 v1(94.7,73.4) ; U1.P32@94.194,82.939 94.194,82.906 v1(94.7,82.4) ; U1.M32@94.194,84.939 94.239,84.939 v1(94.7,85.4) ; U1.K32@94.194,86.939 94.7,86.433 v1(94.7,86.4) ; U1.J32@94.194,87.939 94.633,87.5 v1(94.7,87.5) ; U1.H32@94.194,88.939 94.194,88.931 94.68,88.445 94.7,88.466 94.705,88.461 v1(94.705,88.429) ; U1.G32@94.194,89.939 v1(94.7,89.433) ; U1.F32@94.194,90.939 94.239,90.939 v1(94.7,91.4) ; U1.E32@94.194,91.939 94.194,91.969 v1(94.7,92.475) ; U1.D32@94.194,92.939 94.194,92.994 v1(94.675,93.475) ; U1.B32@94.194,94.939 94.194,94.906 v1(94.7,94.4) ; v1(94.7,61.5) 95.194,61.006 U1.AT33@95.194,60.939 ; v1(94.7,65.4) 95.161,64.939 U1.AM33@95.194,64.939 ; v1@94.7,75.433 U1.AB33@95.194,74.939 ; v1(94.7,77.4) 95.161,76.939 U1.Y33@95.194,76.939 ; v1(94.7,79.4) 95.161,78.939 U1.V33@95.194,78.939 ; v1(94.7,81.4) 94.733,81.4 U1.T33@95.194,80.939 ; v1(94.7,95.5) 95.194,95.006 U1.B33@95.194,94.939 ; U1.AP33@95.194,62.939 95.7,62.433 v1(95.7,62.4) ; U1.P33@95.194,82.939 95.633,82.5 v1(95.633,82.467) ; U1.M33@95.194,84.939 95.6,85.345 v1(95.645,85.345) ; U1.K33@95.194,86.939 95.194,86.906 v1(95.7,86.4) ; U1.J33@95.194,87.939 95.633,87.5 v1(95.7,87.5) ; U1.H33@95.194,88.939 95.236,88.939 v1(95.675,88.5) ; U1.G33@95.194,89.939 95.261,89.939 95.7,89.5 v1(95.7,89.45) ; U1.F33@95.194,90.939 95.239,90.939 v1(95.7,91.4) ; U1.E33@95.194,91.939 95.675,92.42 v1(95.675,92.45) ; U1.D33@95.194,92.939 95.194,92.969 v1(95.675,93.45) ; v1(95.645,61.445) 95.7,61.445 U1.AR34@96.194,61.939 ; v1(95.7,75.5) 95.755,75.5 U1.AA34@96.194,75.939 ; v1(95.7,78.4) 96.161,77.939 U1.W34@96.194,77.939 ; v1(95.7,80.4) 95.733,80.4 U1.U34@96.194,79.939 ; v1(95.7,81.4) 96.194,81.894 U1.R34@96.194,81.939 ; v1(95.733,58.4) U1.AW34@96.194,57.939 ; U1.AU34@96.194,59.939 96.239,59.939 v1(96.7,60.4) ; U1.AN34@96.194,63.939 v1(96.7,63.433) ; U1.AL34@96.194,65.939 96.194,65.906 v1(96.7,65.4) ; U1.AE34@96.194,71.939 96.261,71.939 96.7,71.5 v1(96.7,71.4) ; U1.N34@96.194,83.939 96.236,83.939 v1(96.75,83.425) ; U1.L34@96.194,85.939 96.239,85.939 v1(96.7,86.4) ; U1.J34@96.194,87.939 96.261,87.939 v1(96.7,87.5) ; U1.G34@96.194,89.939 96.261,89.939 v1(96.7,89.5) ; U1.E34@96.194,91.939 96.194,91.969 v1(96.675,92.45) ; U1.C34@96.194,93.939 96.261,93.939 v1(96.7,93.5) ; v1(96.7,61.5) 96.7,61.445 U1.AR35@97.194,61.939 ; v1(96.7,72.5) 97.194,72.006 U1.AE35@97.194,71.939 ; v1(96.7,78.4) 96.733,78.4 U1.W35@97.194,77.939 ; v1(96.7,80.4) 96.733,80.4 U1.U35@97.194,79.939 ; v1(96.7,81.4) 97.194,81.894 U1.R35@97.194,81.939 ; U1.AW35@97.194,57.939 97.5,57.633 v1(97.5,57.4) ; U1.AU35@97.194,59.939 97.7,59.433 v1(97.7,59.4) ; U1.AN35@97.194,63.939 97.261,63.939 97.7,63.5 v1(97.7,63.4) ; U1.AL35@97.194,65.939 97.194,65.906 v1(97.7,65.4) ; U1.AJ35@97.194,67.939 97.261,67.939 v1(97.7,67.5) ; U1.AF35@97.194,70.939 97.239,70.939 v1(97.7,71.4) ; U1.N35@97.194,83.939 97.683,83.45 v1(97.725,83.45) ; U1.L35@97.194,85.939 97.239,85.939 v1(97.7,86.4) ; U1.J35@97.194,87.939 97.633,87.5 v1(97.7,87.5) ; U1.G35@97.194,89.939 97.633,89.5 v1(97.7,89.5) ; U1.E35@97.194,91.939 97.194,91.969 v1(97.7,92.475) ; U1.C35@97.194,93.939 97.633,93.5 v1(97.7,93.5) ; v1(97.7,60.4) 98.194,60.894 U1.AT36@98.194,60.939 ; v1(97.7,79.4) 97.733,79.4 U1.V36@98.194,78.939 ; v1(97.7,81.4) 97.733,81.4 U1.T36@98.194,80.939 ; U1.AP36@98.194,62.939 98.194,62.906 98.6,62.5 v1(98.65,62.5) ; U1.AM36@98.194,64.939 98.194,64.906 v1(98.67,64.43) ; U1.AF36@98.194,70.939 98.655,71.4 v1(98.7,71.4) ; U1.AD36@98.194,72.939 98.239,72.939 v1(98.7,73.4) ; U1.P36@98.194,82.939 98.7,82.433 v1(98.7,82.5) ; U1.M36@98.194,84.939 98.239,84.939 v1(98.7,85.4) ; U1.K36@98.194,86.939 98.7,86.433 v1(98.7,86.425) ; U1.H36@98.194,88.939 98.239,88.939 v1(98.7,89.4) ; U1.F36@98.194,90.939 98.239,90.939 v1(98.7,91.4) ; U1.D36@98.194,92.939 98.675,92.458 v1(98.675,92.425) ; U1.B36@98.194,94.939 98.194,94.931 v1(98.675,94.45) ; v1(98.7,60.4) 99.194,60.894 U1.AT37@99.194,60.939 ; v1(98.7,67.5) 99.194,67.006 U1.AK37@99.194,66.939 ; v1(98.7,69.5) 99.194,69.006 U1.AH37@99.194,68.939 ; v1(98.7,81.4) 99.161,80.939 U1.T37@99.194,80.939 ; v1(98.7,87.5) 99.194,87.006 U1.K37@99.194,86.939 ; v1(98.8,79.4) 99.194,79.006 U1.V37@99.194,78.939 ; U1.AP37@99.194,62.939 99.194,62.906 99.6,62.5 v1(99.7,62.5) ; U1.AM37@99.194,64.939 99.194,64.906 v1(99.7,64.4) ; U1.AF37@99.194,70.939 99.194,70.994 v1(99.6,71.4) ; U1.AD37@99.194,72.939 99.239,72.939 v1(99.7,73.4) ; U1.P37@99.194,82.939 99.261,82.939 v1(99.7,82.5) ; U1.M37@99.194,84.939 99.239,84.939 v1(99.7,85.4) ; U1.H37@99.194,88.939 99.6,89.345 v1(99.6,89.4) ; U1.F37@99.194,90.939 99.655,91.4 v1(99.7,91.4) ; U1.D37@99.194,92.939 99.194,92.831 v1(99.65,92.375) ; U1.B37@99.194,94.939 99.194,94.856 v1(99.625,94.425) ; v1(99.7,61.5) 100.139,61.939 U1.AR38@100.194,61.939 ; v1(99.7,67.465) 100.174,67.939 U1.AJ38@100.194,67.939 ; v1(99.7,69.5) 99.755,69.5 U1.AG38@100.194,69.939 ; v1(99.7,87.5) 99.755,87.5 U1.J38@100.194,87.939 ; v1(99.8,78.4) 100.194,78.006 U1.W38@100.194,77.939 ; v1(99.8,80.4) 100.194,80.006 U1.U38@100.194,79.939 ; U1.AU38@100.194,59.939 100.239,59.939 v1(100.7,60.4) ; U1.AN38@100.194,63.939 100.194,63.906 v1(100.6,63.5) ; U1.AL38@100.194,65.939 100.261,65.939 100.65,65.55 v1(100.65,65.4) ; U1.R38@100.194,81.939 100.194,81.906 v1(100.7,81.4) ; U1.N38@100.194,83.939 100.236,83.939 v1(100.725,83.45) ; U1.L38@100.194,85.939 100.239,85.939 v1(100.7,86.4) ; U1.G38@100.194,89.939 100.7,89.433 v1(100.7,89.4) ; U1.E38@100.194,91.939 100.194,91.994 v1(100.65,92.45) ; U1.C38@100.194,93.939 100.633,93.5 v1(100.7,93.5) ; v1(100.7,61.5) 100.755,61.5 U1.AR39@101.194,61.939 ; v1(100.7,78.4) 101.161,77.939 U1.W39@101.194,77.939 ; v1(100.7,80.4) 100.733,80.4 U1.U39@101.194,79.939 ; v1(100.7,87.5) 100.755,87.5 U1.J39@101.194,87.939 ; U1.AU39@101.194,59.939 101.861,59.939 v1(101.9,59.9) ; U1.AN39@101.194,63.939 101.361,63.939 v1(101.8,63.5) ; U1.AL39@101.194,65.939 101.734,65.4 v1(101.8,65.4) ; U1.AJ39@101.194,67.939 101.194,68.094 v1(101.5,68.4) ; U1.R39@101.194,81.939 101.261,81.939 v1(101.8,81.4) ; U1.N39@101.194,83.939 101.286,83.939 v1(101.775,83.45) ; U1.L39@101.194,85.939 101.239,85.939 v1(101.7,86.4) ; U1.G39@101.194,89.939 101.733,89.4 v1(101.8,89.4) ; U1.E39@101.194,91.939 101.239,91.939 v1(101.725,92.425) ; U1.C39@101.194,93.939 101.633,93.5 v1(101.7,93.5)
  1_Top w0.25: J20.2@18.4,47.475 18.423,47.452 v1(19.576,47.452) ; J20.6@18.4,48.475 v1(19.602,48.475) ; J20.10@18.4,49.475 v1(19.602,49.475) ; J20.14@18.4,50.475 v1(19.602,50.475) ; J20.18@18.4,51.475 v1(19.602,51.475) ; J20.22@18.4,52.475 v1(19.602,52.475) ; J20.26@18.4,53.475 v1(19.602,53.475) ; J20.30@18.4,54.475 v1(19.602,54.475) ; J20.36@18.4,55.975 v1(19.602,55.975) ; J20.40@18.4,56.975 v1(19.602,56.975) ; J20.44@18.4,57.975 v1(19.602,57.975) ; J20.48@18.4,58.975 v1(19.602,58.975) ; J20.52@18.4,59.975 v1(19.602,59.975) ; J20.56@18.4,60.975 v1(19.602,60.975) ; J20.60@18.4,61.975 v1(19.602,61.975) ; J20.64@18.4,62.975 v1(19.602,62.975) ; J20.68@18.4,63.975 v1(19.602,63.975) ; J20.72@18.4,64.975 v1(19.602,64.975) ; J20.78@18.4,66.475 v1(19.602,66.475) ; J20.82@18.4,67.475 v1(19.602,67.475) ; J20.86@18.4,68.475 v1(19.602,68.475) ; J20.90@18.4,69.475 v1(19.602,69.475) ; J20.94@18.4,70.475 v1(19.602,70.475) ; J20.98@18.4,71.475 v1(19.602,71.475) ; J20.102@18.4,72.475 v1(19.602,72.475) ; J20.106@18.4,73.475 v1(19.602,73.475) ; J20.168@18.4,90.975 v1(19.602,90.975) ; J20.172@18.4,91.975 v1(19.602,91.975) ; J20.176@18.4,92.975 v1(19.602,92.975) ; J20.180@18.4,93.975 v1(19.602,93.975) ; J20.184@18.4,94.975 v1(19.602,94.975) ; J20.188@18.4,95.975 v1(19.602,95.975) ; J20.192@18.4,96.975 v1(19.602,96.975) ; J20.196@18.4,97.975 v1(19.602,97.975) ; J20.202@18.4,99.475 v1(19.602,99.475) ; J20.206@18.4,100.475 v1(19.602,100.475) ; J20.210@18.4,101.475 v1(19.602,101.475) ; J20.214@18.4,102.475 v1(19.602,102.475) ; J20.218@18.4,103.475 v1(19.602,103.475) ; J20.222@18.4,104.475 v1(19.602,104.475) ; J20.226@18.4,105.475 v1(19.602,105.475) ; J20.230@18.4,106.475 v1(19.602,106.475) ; J20.234@18.4,107.475 v1(19.602,107.475) ; J20.238@18.4,108.475 v1(19.602,108.475) ; J20.244@18.4,109.975 v1(19.602,109.975) ; J20.248@18.4,110.975 v1(19.602,110.975) ; J20.252@18.4,111.975 v1(19.602,111.975) ; v1(25.375,55.725) J20.35@26.6,55.725 ; v1(25.375,96.225) J20.189@26.6,96.225 ; v1(25.375,97.225) J20.193@26.6,97.225 ; v1(25.375,100.225) J20.205@26.6,100.225 ; v1(25.375,101.225) J20.209@26.6,101.225 ; v1(25.375,102.225) J20.213@26.6,102.225 ; v1(25.375,103.225) J20.217@26.6,103.225 ; v1(25.375,104.725) J20.223@26.6,104.725 ; v1(25.375,107.725) J20.235@26.6,107.725 ; v1(25.375,110.725) 26.489,110.725 26.495,110.73 26.55,110.675 J20.247@26.6,110.725 ; v1(25.375,111.725) J20.251@26.6,111.725 ; v1(25.376,66.228) 26.547,66.228 26.575,66.2 J20.77@26.6,66.225 ; v1(25.376,99.23) 26.545,99.23 26.575,99.2 J20.201@26.6,99.225 ; v1(25.376,105.73) 26.545,105.73 26.575,105.7 J20.227@26.6,105.725 ; v1(25.376,106.73) 26.545,106.73 26.575,106.7 J20.231@26.6,106.725 ; v1(25.376,109.73) 26.545,109.73 26.575,109.7 J20.243@26.6,109.725 ; v1(25.398,47.225) J20.1@26.6,47.225 ; v1(25.398,48.225) J20.5@26.6,48.225 ; v1(25.398,49.225) J20.9@26.6,49.225 ; v1(25.398,50.725) J20.15@26.6,50.725 ; v1(25.398,51.725) J20.19@26.6,51.725 ; v1(25.398,52.725) J20.23@26.6,52.725 ; v1(25.398,53.725) J20.27@26.6,53.725 ; v1(25.398,56.725) J20.39@26.6,56.725 ; v1(25.398,57.725) J20.43@26.6,57.725 ; v1(25.398,58.725) J20.47@26.6,58.725 ; v1(25.398,59.725) J20.51@26.6,59.725 ; v1(25.398,61.225) J20.57@26.6,61.225 ; v1(25.398,62.225) J20.61@26.6,62.225 ; v1(25.398,63.225) J20.65@26.6,63.225 ; v1(25.398,64.225) J20.69@26.6,64.225 ; v1(25.398,67.225) J20.81@26.6,67.225 ; v1(25.398,68.225) J20.85@26.6,68.225 ; v1(25.398,69.225) J20.89@26.6,69.225 ; v1(25.398,70.225) J20.93@26.6,70.225 ; v1(25.398,71.725) J20.99@26.6,71.725 ; v1(25.398,72.725) J20.103@26.6,72.725 ; v1(25.398,73.725) J20.107@26.6,73.725 ; v1(25.398,90.725) J20.167@26.6,90.725 ; v1(25.398,91.725) J20.171@26.6,91.725 ; v1(25.398,92.725) J20.175@26.6,92.725 ; v1(25.398,94.225) J20.181@26.6,94.225 ; v1(25.398,95.225) J20.185@26.6,95.225 ; J8.2@30.4,47.475 v1(31.602,47.475) ; J8.6@30.4,48.475 v1(31.602,48.475) ; J8.10@30.4,49.475 v1(31.602,49.475) ; J8.14@30.4,50.475 v1(31.602,50.475) ; J8.18@30.4,51.475 v1(31.602,51.475) ; J8.22@30.4,52.475 v1(31.602,52.475) ; J8.26@30.4,53.475 v1(31.602,53.475) ; J8.30@30.4,54.475 v1(31.602,54.475) ; J8.36@30.4,55.975 v1(31.602,55.975) ; J8.40@30.4,56.975 v1(31.602,56.975) ; J8.44@30.4,57.975 v1(31.602,57.975) ; J8.48@30.4,58.975 v1(31.602,58.975) ; J8.52@30.4,59.975 v1(31.602,59.975) ; J8.56@30.4,60.975 v1(31.602,60.975) ; J8.60@30.4,61.975 v1(31.602,61.975) ; J8.64@30.4,62.975 v1(31.602,62.975) ; J8.68@30.4,63.975 v1(31.602,63.975) ; J8.72@30.4,64.975 v1(31.602,64.975) ; J8.78@30.4,66.475 v1(31.602,66.475) ; J8.82@30.4,67.475 v1(31.602,67.475) ; J8.86@30.4,68.475 v1(31.602,68.475) ; J8.90@30.4,69.475 v1(31.602,69.475) ; J8.94@30.4,70.475 v1(31.602,70.475) ; J8.98@30.4,71.475 v1(31.602,71.475) ; J8.102@30.4,72.475 v1(31.602,72.475) ; J8.106@30.4,73.475 v1(31.602,73.475) ; J8.168@30.4,90.975 v1(31.602,90.975) ; J8.172@30.4,91.975 v1(31.602,91.975) ; J8.176@30.4,92.975 v1(31.602,92.975) ; J8.180@30.4,93.975 v1(31.602,93.975) ; J8.184@30.4,94.975 v1(31.602,94.975) ; J8.188@30.4,95.975 v1(31.602,95.975) ; J8.192@30.4,96.975 v1(31.602,96.975) ; J8.196@30.4,97.975 v1(31.602,97.975) ; J8.202@30.4,99.475 v1(31.602,99.475) ; J8.206@30.4,100.475 v1(31.602,100.475) ; J8.210@30.4,101.475 v1(31.602,101.475) ; J8.214@30.4,102.475 v1(31.602,102.475) ; J8.218@30.4,103.475 v1(31.602,103.475) ; J8.222@30.4,104.475 v1(31.602,104.475) ; J8.226@30.4,105.475 v1(31.602,105.475) ; J8.230@30.4,106.475 v1(31.602,106.475) ; J8.234@30.4,107.475 v1(31.602,107.475) ; J8.238@30.4,108.475 v1(31.602,108.475) ; J8.244@30.4,109.975 v1(31.602,109.975) ; J8.248@30.4,110.975 v1(31.602,110.975) ; J8.252@30.4,111.975 v1(31.602,111.975) ; J8.1@38.6,47.225 v1(39.75,47.225) ; J8.5@38.6,48.225 v1(39.75,48.225) ; J8.9@38.6,49.225 v1(39.75,49.225) ; J8.15@38.6,50.725 v1(39.775,50.725) ; J8.19@38.6,51.725 v1(39.75,51.725) ; J8.23@38.6,52.725 39.65,52.725 39.75,52.825 v1(39.75,53.725) J8.27@38.6,53.725 ; J8.31@38.6,54.725 v1(39.75,54.725) ; J8.35@38.6,55.725 v1(39.75,55.725) ; J8.39@38.6,56.725 v1(39.75,56.725) ; J8.43@38.6,57.725 v1(39.75,57.725) ; J8.47@38.6,58.725 v1(39.75,58.725) ; J8.51@38.6,59.725 v1(39.75,59.725) ; J8.57@38.6,61.225 v1(39.75,61.225) ; J8.61@38.6,62.225 v1(39.75,62.225) ; J8.65@38.6,63.225 v1(39.75,63.225) ; J8.69@38.6,64.225 v1(39.75,64.225) ; J8.73@38.6,65.225 v1(39.75,65.225) ; J8.77@38.6,66.225 v1(39.75,66.225) ; J8.81@38.6,67.225 v1(39.75,67.225) ; J8.85@38.6,68.225 v1(39.75,68.225) ; J8.89@38.6,69.225 v1(39.75,69.225) ; J8.93@38.6,70.225 v1(39.75,70.225) ; J8.99@38.6,71.725 v1(39.75,71.725) ; J8.103@38.6,72.725 v1(39.75,72.725) ; J8.107@38.6,73.725 v1(39.75,73.725) ; J8.167@38.6,90.725 v1(39.75,90.725) ; J8.171@38.6,91.725 38.62,91.745 39.745,91.745 v1(39.75,91.75) ; J8.175@38.6,92.725 v1(39.75,92.725) ; J8.181@38.6,94.225 v1(39.75,94.225) ; J8.185@38.6,95.225 v1(39.75,95.225) ; J8.189@38.6,96.225 v1(39.75,96.225) ; J8.193@38.6,97.225 v1(39.75,97.225) ; J8.197@38.6,98.225 v1(39.75,98.225) ; J8.201@38.6,99.225 v1(39.75,99.225) ; J8.205@38.6,100.225 v1(39.75,100.225) ; J8.209@38.6,101.225 v1(39.75,101.225) ; J8.213@38.6,102.225 v1(39.75,102.225) ; J8.217@38.6,103.225 v1(39.75,103.225) ; J8.223@38.6,104.725 v1(39.75,104.725) ; J8.227@38.6,105.725 v1(39.75,105.725) ; J8.231@38.6,106.725 v1(39.75,106.725) ; J8.235@38.6,107.725 v1(39.75,107.725) ; J8.239@38.6,108.725 v1(39.75,108.725) ; J8.243@38.6,109.725 v1(39.75,109.725) ; J8.247@38.6,110.725 v1(39.75,110.725) ; J8.251@38.6,111.725 v1(39.75,111.725) ; v1(62.575,70.375) 62.6,70.375 63.164,70.939 U1.AF1@63.194,70.939 ; v1(62.65,65.4) 62.655,65.4 U1.AL1@63.194,65.939 ; v1(62.694,60.439) U1.AT1@63.194,60.939 ; v1(62.75,76.425) 62.75,76.383 U1.AA1@63.194,75.939 ; U1.F1@63.194,90.939 v1(63.694,91.439) ; v1(63.65,62.395) U1.AP2@64.194,62.939 ; v1(63.65,78.5) 64.194,77.956 U1.W2@64.194,77.939 ; v1(63.694,67.439) U1.AJ2@64.194,67.939 ; v1(63.694,83.439) U1.P2@64.194,82.939 ; v1(63.694,93.439) U1.D2@64.194,92.939 ; v1(63.694,95.439) U1.B2@64.194,94.939 ; v1(63.7,72.4) 64.194,72.894 U1.AD2@64.194,72.939 ; v1(63.7,88.4) 64.161,87.939 U1.J2@64.194,87.939 ; v1(64.6,59.45) 64.705,59.45 U1.AU3@65.194,59.939 ; v1(64.65,64.4) 64.655,64.4 U1.AM3@65.194,64.939 ; v1(64.675,74.425) 64.68,74.425 U1.AB3@65.194,74.939 ; v1(64.694,90.439) U1.G3@65.194,89.939 ; v1(64.694,95.439) U1.B3@65.194,94.939 ; v1(64.7,80.433) U1.U3@65.194,79.939 ; v1(64.7,85.4) 65.161,84.939 U1.M3@65.194,84.939 ; U1.AG3@65.194,69.939 v1(65.658,69.475) ; v1(65.694,61.439) U1.AR4@66.194,61.939 ; v1(65.694,66.439) U1.AK4@66.194,66.939 ; v1(65.694,92.439) U1.E4@66.194,91.939 ; U1.AE4@66.194,71.939 66.194,71.906 v1(66.625,71.475) ; v1(66.65,63.425) 66.68,63.425 U1.AN5@67.194,63.939 ; v1(66.694,94.439) U1.C5@67.194,93.939 ; v1(66.729,84.375) 66.758,84.375 U1.N5@67.194,83.939 ; v1(66.75,89.375) U1.H5@67.194,88.931 ; U1.AV5@67.194,58.939 67.705,59.45 v1(67.75,59.45) ; U1.H5@67.194,88.819 U1.H5@67.194,88.931 ; U1.H5@67.194,88.939 U1.H5@67.194,88.931 ; v1(67.6,67.4) 67.6,67.466 67.592,67.474 68.729,67.474 U1.AJ7@69.194,67.939 ; v1(67.694,96.439) U1.A6@68.194,95.939 ; v1(67.7,91.4) 67.733,91.4 U1.F6@68.194,90.939 ; U1.AT6@68.194,60.939 68.7,60.433 v1(68.7,60.375) ; U1.AF6@68.194,70.939 68.683,70.45 v1(68.7,70.45) ; v1(68.694,93.439) U1.D7@69.194,92.939 ; v1(68.7,57.375) 68.7,57.445 U1.AW7@69.194,57.939 ; v1(68.7,88.375) 68.729,88.375 69.164,87.939 U1.J7@69.194,87.939 ; U1.AP7@69.194,62.939 69.7,62.433 v1(69.7,62.4) ; U1.W7@69.194,77.939 69.225,77.939 v1(69.7,78.414) ; U1.P7@69.194,82.939 v1(69.694,83.439) ; v1(69.694,80.439) U1.U8@70.194,79.939 ; v1(69.694,95.439) U1.B8@70.194,94.939 ; v1(69.725,60.475) 69.725,60.408 U1.AU8@70.194,59.939 ; U1.AB8@70.194,74.939 70.239,74.939 v1(70.75,75.45) ; v1(70.65,71.425) 70.68,71.425 U1.AE9@71.194,71.939 ; v1(70.675,77.45) 70.683,77.45 U1.Y9@71.194,76.939 ; v1(70.694,82.439) U1.R9@71.194,81.939 ; v1(70.694,92.439) U1.E9@71.194,91.939 ; U1.AR9@71.194,61.939 U1.AR9@71.194,61.939 v1(71.729,61.403) ; v1(71.69,84.429) 71.704,84.429 U1.N10@72.194,83.939 ; v1(71.694,79.439) U1.V10@72.194,78.939 ; v1(71.694,89.439) U1.H10@72.194,88.939 ; v1(71.725,58.47) U1.AV10@72.194,58.939 ; v1(71.725,63.448) 71.725,63.47 U1.AN10@72.194,63.939 ; v1(71.725,73.425) 71.725,73.47 U1.AC10@72.194,73.939 ; v1(72.679,70.478) 72.726,70.478 72.73,70.475 U1.AF11@73.194,70.939 ; v1(72.694,81.439) U1.T11@73.194,80.939 ; v1(72.775,60.475) 72.775,60.52 U1.AT11@73.194,60.939 ; U1.F11@73.194,90.939 73.675,90.458 v1(73.675,90.45) ; v1(73.694,62.439) U1.AP12@74.194,62.939 ; v1(73.694,78.439) U1.W12@74.194,77.939 ; v1(73.694,83.439) U1.P12@74.194,82.939 ; v1(73.7,67.45) 73.705,67.45 U1.AJ12@74.194,67.939 ; U1.D12@74.194,92.939 74.214,92.939 v1(74.675,93.4) ; v1(74.65,85.4) 75.111,84.939 U1.M13@75.194,84.939 ; v1(74.694,59.439) U1.AU13@75.194,59.939 ; v1(74.7,80.4) 74.733,80.4 U1.U13@75.194,79.939 ; v1(74.704,69.453) 74.708,69.453 U1.AG13@75.194,69.939 ; v1(76.73,68.475) U1.AH15@77.194,68.939 ; U1.H15@77.194,88.939 77.194,88.944 v1(77.675,89.425) ; v1(78.75,87.5) 78.755,87.5 U1.J17@79.194,87.939 ; v1(80.675,92.479) 80.675,92.458 U1.E19@81.194,91.939 ; U1.C20@82.194,93.939 82.194,93.969 82.65,94.425 v1(82.7,94.425) ; U1.F21@83.194,90.939 v1@83.7,91.445 ; v1(83.7,93.475) 84.194,92.981 U1.D22@84.194,92.939 ; v1(111.2,61.2) 111.3,61.2 111.4,61.1 111.5,61 U15.A8@112,61 ; v1(111.425,56.175) 111.45,56.2 U15.A2@112,56.2 ; v1(111.6,68.5) U14.A2@112,68.9 ; v1(112.4,55.8) U15.B2@112.8,56.2 ; v1(112.4,68.489) 112.4,68.5 U14.B2@112.8,68.9 ; U15.C9@113.6,61.8 v1(113.6,62.4) ; U14.C9@113.6,74.5 113.6,75 113.65,75.05 v1(113.675,75.05) ; v1(114,61.4) U15.D8@114.4,61 ; U15.D2@114.4,56.2 U15.E3@115.2,57 ; U14.D2@114.4,68.9 114.739,69.239 v1(114.739,69.261) ; v1(114.8,61.4) U15.E8@115.2,61 ; U15.E1@115.2,55.4 115.2,55 v1(115.4,54.8) ; U15.E9@115.2,61.8 v1(115.2,62.4) ; v1(116,54.8) 116,54.73 115.997,54.728 116,54.725 U15.F1@116,55.4 ; v1(116.4,61.4) U15.G8@116.8,61 ; v1(117.5,67) v1@117.5,67.035 ; v1@117.514,67.085 117.5,67.071 v1@117.5,67.035 ; U15.H1@117.6,55.4 117.8,55.2 v1(117.8,54.8) ; U15.H9@117.6,61.8 v1(117.6,62.4) ; U14.H1@117.6,68.1 117.6,67.135 v1@117.5,67.035 ; v3(136.21,146.82) 136.825,146.205 U23.C8@136.955,146.205 ; v3(136.31,145.52) 136.37,145.52 U23.C7@136.955,144.935 ; v3(136.31,148.12) U23.C9@136.955,147.475 ; v3(142.59,82.995) 142.69,82.995 143.265,82.42 U10.D4@143.265,82.37 ; v3(145.215,84.37) 145.805,83.78 U10.C6@145.805,83.64
  1_Top w0.3: 6.1,145 6.515,144.585 7.965,144.585 J13.9@8,144.55 9.25,144.55 9.6,144.2 ; 14.95,131.35 J13.34@16.2,131.35 17.45,131.35 ; 24.825,65.225 J20.73@26.6,65.225 ; 24.875,108.725 J20.239@26.6,108.725 ; 24.975,54.725 J20.31@26.6,54.725 ; 25.025,98.225 J20.197@26.6,98.225 ; U28.5@53.5,128.6 53.5,127.4 v8(54.25,126.65) ; Y2.4@55.945,130.425 56.725,130.425 v3(56.9,130.6) ; v3(59.125,123.975) Y1.4@60.075,123.975 ; U30.25@61.745,136.9 62.245,136.4 U30.23@62.245,135.2 ; C539.1@62,132.5 C540.1@62.8,132.5 ; 62.361,80.939 U1.T1@63.194,80.939 ; 62.361,85.939 U1.L1@63.194,85.939 ; Y4.4@64.77,134.85 65,134.62 65,134 v3(65.2,133.8) v3@65.046,133.8 ; v1(71.653,93.33) 71.653,93.385 71.65,93.388 71.678,93.417 71.675,93.42 U1.C10@72.194,93.939 ; U1.AH10@72.194,68.939 72.194,68.906 v1(72.7,68.4) ; U1.AA11@73.194,75.939 73.675,75.458 v1(73.675,75.45) ; U1.A11@73.194,95.939 73.194,96.194 v1(73.475,96.475) ; v1@73.68,73.454 U1.AD12@74.194,72.939 ; 74.5,53.3 74.5,56.513 74.194,56.819 U1.AW12@74.194,57.939 74.684,58.429 74.684,59.429 v1(74.694,59.439) ; v1(74.704,75.429) 74.746,75.429 75.194,74.981 U1.AB13@75.194,74.939 ; U1.B13@75.194,94.939 75.194,94.944 v1(75.65,95.4) ; v1(75.7,63.425) 75.708,63.425 U1.AP14@76.194,62.939 ; v1(75.725,62.425) 76.194,61.956 U1.AR14@76.194,61.939 ; U1.E14@76.194,91.939 76.211,91.939 v1(76.7,91.45) ; v1(76.65,64.4) 77.111,63.939 U1.AN15@77.194,63.939 ; v1(76.675,79.475) 76.675,79.458 U1.V15@77.194,78.939 ; v1(76.7,74.45) 76.7,74.433 U1.AC15@77.194,73.939 ; v1(76.725,61.425) 77.194,61.894 U1.AR15@77.194,61.939 ; v1(76.725,93.4) 76.733,93.4 U1.D15@77.194,92.939 ; v1(76.775,77.45) 77.194,77.031 U1.Y15@77.194,76.939 ; v1(76.775,84.425) 77.194,84.006 U1.N15@77.194,83.939 ; U1.AV15@77.194,58.939 77.239,58.939 v1(77.65,59.35) ; U1.C15@77.194,93.939 77.625,94.37 v1(77.625,94.4) ; 77.3,51.85 R323.1@77.3,52.7 ; v1(77.65,60.425) 78.164,60.939 U1.AT16@78.194,60.939 ; v1(77.675,71.375) 78.111,70.939 U1.AF16@78.194,70.939 ; v1(77.75,81.325) 78.136,80.939 U1.T16@78.194,80.939 ; v1(77.75,91.375) 77.758,91.375 U1.F16@78.194,90.939 ; v1(77.775,86.425) 78.194,86.006 U1.L16@78.194,85.939 ; U1.AL16@78.194,65.939 78.239,65.939 v1(78.7,66.4) ; U1.A16@78.194,95.939 78.194,96.694 ; v1(78.7,78.475) 79.194,77.981 U1.W17@79.194,77.939 ; v1(78.725,76.425) 79.194,75.956 U1.AA17@79.194,75.939 ; v1(78.725,83.45) 79.194,82.981 U1.P17@79.194,82.939 ; v1(78.95,57.275) 79.194,57.519 U1.AW17@79.194,57.939 ; U1.AJ17@79.194,67.939 79.194,67.994 79.65,68.45 v1(79.7,68.45) ; U1.D17@79.194,92.939 79.708,92.425 v1(79.725,92.425) ; U1.B17@79.194,94.939 79.7,94.433 v1(79.7,94.4) ; v1(79.675,70.45) 79.683,70.45 U1.AG18@80.194,69.939 ; v1(79.7,95.4) 80.194,94.906 U1.B18@80.194,94.939 ; v1(79.725,75.425) 80.194,74.956 U1.AB18@80.194,74.939 ; v1(79.725,85.4) 79.733,85.4 U1.M18@80.194,84.939 ; v1(79.733,90.467) 79.733,90.4 U1.G18@80.194,89.939 ; v1(79.75,80.45) 79.75,80.383 U1.U18@80.194,79.939 ; U1.AU18@80.194,59.939 80.65,60.395 v1(80.65,60.4) ; v1(80.675,72.475) 80.675,72.458 U1.AE19@81.194,71.939 ; v1(80.75,77.45) 80.75,77.383 U1.Y19@81.194,76.939 ; v1(80.75,82.45) 81.194,82.006 U1.R19@81.194,81.939 ; U1.AR19@81.194,61.939 81.211,61.939 v1(81.65,61.5) ; v1(81.65,69.45) 82.161,68.939 U1.AH20@82.194,68.939 ; v1(81.65,74.45) 82.161,73.939 U1.AC20@82.194,73.939 ; v1(81.7,59.55) 82.194,59.056 U1.AV20@82.194,58.939 ; v1(81.7,79.4) 82.161,78.939 U1.V20@82.194,78.939 ; U1.AN20@82.194,63.939 82.211,63.939 v1(82.7,63.45) ; v1(82.7,76.425) 82.708,76.425 U1.AA21@83.194,75.939 ; v1(82.7,84.425) 82.708,84.425 U1.N21@83.194,83.939 ; v1(82.75,81.45) 83.194,81.006 U1.T21@83.194,80.939 ; v1(82.75,86.425) 83.194,85.981 U1.L21@83.194,85.939 ; v1(83.7,58.425) 83.708,58.425 U1.AW22@84.194,57.939 ; v1(83.7,74.4) 84.161,73.939 U1.AC22@84.194,73.939 ; v1@83.7,91.445 84.555,91.445 84.704,91.296 84.704,90.496 85.194,90.006 U1.G23@85.194,89.939 ; v1(83.75,78.375) 84.186,77.939 U1.W22@84.194,77.939 ; v1(83.775,68.4) 84.194,67.981 U1.AJ22@84.194,67.939 ; v1(84.7,60.4) 85.161,59.939 U1.AU23@85.194,59.939 ; v1(84.7,85.45) 85.194,84.956 U1.M23@85.194,84.939 ; v1(84.704,80.404) 84.746,80.404 85.194,79.956 U1.U23@85.194,79.939 ; v1(84.725,70.45) 85.194,69.981 U1.AG23@85.194,69.939 ; v1(84.75,65.4) 84.75,65.383 U1.AM23@85.194,64.939 ; v1(84.75,75.45) 85.194,75.006 U1.AB23@85.194,74.939 ; v1(85.7,77.425) 85.708,77.425 U1.Y24@86.194,76.939 ; v1(85.725,82.55) 85.725,82.408 U1.R24@86.194,81.939 ; v1(85.75,72.45) 86.194,72.006 U1.AE24@86.194,71.939 ; X1.2@86.25,15.775 87,15.775 87.4,16.175 C565.1@87.4,16.94 ; v1(86.725,78.45) 87.194,78.919 U1.V25@87.194,78.939 ; v1(86.775,74.45) 87.194,74.031 U1.AC25@87.194,73.939 ; v1(87.675,73.4) 88.136,72.939 U1.AD26@88.194,72.939 ; v1(87.679,81.404) 87.679,81.371 88.111,80.939 U1.T26@88.194,80.939 ; v1(87.725,74.45) 87.725,74.47 U1.AB26@88.194,74.939 ; v1(87.725,77.425) 88.194,76.956 U1.Y26@88.194,76.939 ; v1(87.725,79.425) 87.725,79.408 U1.V26@88.194,78.939 ; v1(87.775,78.4) 87.775,78.358 U1.W26@88.194,77.939 ; v1(87.775,82.45) 88.194,82.031 U1.R26@88.194,81.939 ; v1(88.65,75.4) 89.111,74.939 U1.AB27@89.194,74.939 ; v1(88.7,78.425) 88.708,78.425 U1.W27@89.194,77.939 ; v1@88.725,76.35 89.136,75.939 U1.AA27@89.194,75.939 ; v1(88.8,79.425) 89.194,79.031 U1.V27@89.194,78.939 ; U1.AL27@89.194,65.939 U1.AK27@89.194,66.939 ; U1.A27@89.194,95.939 89.194,96.694 ; v1(90.7,74.4) 91.161,73.939 U1.AC29@91.194,73.939 ; U1.E30@92.194,91.939 92.214,91.939 v1(92.675,92.4) ; 93.1,19 93.1,18.7 v5(93.5,18.3) ; U1.D31@93.194,92.939 93.206,92.939 v1@93.7,92.445 ; U1.AK32@94.194,66.939 U1.AK33@95.194,66.939 ; U1.AH33@95.194,68.939 U1.AJ34@96.194,67.939 ; U1.AD33@95.194,72.939 U1.AC34@96.194,73.939 U1.AC35@97.194,73.939 U1.AB36@98.194,74.939 U1.AB37@99.194,74.939 U1.AA38@100.194,75.939 U1.AA39@101.194,75.939 ; U1.A34@96.194,95.939 96.194,96.794 ; U1.A35@97.194,95.939 97.194,96.794 ; v3(98.025,131.675) Y3.2@98.975,131.675 ; U1.Y36@98.194,76.939 98.675,76.939 ; v5(98.675,78.375) 98.675,78.16 98.684,78.151 98.684,76.948 98.675,76.939 ; U1.Y37@99.194,76.939 98.675,76.939 ; U1.A38@100.194,95.939 100.194,96.794 ; U14.E8@115.2,73.7 115.161,73.739 115.161,74.461 U14.E9@115.2,74.5 ; v3(135.05,140.49) U23.B4@135.685,141.125 ; v3(135.05,141.76) U23.B5@135.685,142.395 ; v3(135.05,143.03) U23.B6@135.685,143.665 U23.C6@136.955,143.665 ; v3(135.05,145.57) U23.B7@135.685,144.935 ; v3(135.05,146.84) U23.B8@135.685,146.205 ; v3(135.05,148.11) U23.B9@135.685,147.475 ; v3(136.32,140.49) U23.C4@136.955,141.125 U23.D4@138.225,141.125 ; v3(137.557,145.582) 137.578,145.582 U23.D7@138.225,144.935 ; v3(138.86,139.22) U23.E3@139.495,139.855 v3(140.13,139.22) U23.F3@140.765,139.855 140.765,140.065 141.09,140.39 141.5,140.39 U23.G3@142.035,139.855 v3(142.67,139.22) U23.H3@143.305,139.855 ; 139.8,42.5 J7.14@139.8,44.05 ; U23.F10@140.765,148.745 140.78,148.73 144.56,148.73 U23.J10@144.575,148.745 ; v3(141.36,76.655) U10.H3@141.995,77.29 ; v3(141.36,77.925) U10.G3@141.995,78.56 ; v3(141.36,80.465) U10.F3@141.995,79.83 ; v3(141.36,81.735) U10.E3@141.995,81.1 ; U23.G10@142.035,148.745 U23.G11@142.035,150.015 v3(142.67,150.65) ; v3(142.63,72.845) U10.L4@143.265,73.48 ; v3(142.63,74.115) U10.K4@143.265,74.75 ; v3(142.63,76.655) U10.J4@143.265,76.02 ; v3(142.63,84.275) U10.C4@143.265,83.64 ; v3(142.63,85.545) U10.B4@143.265,84.91 ; v3(143.9,72.845) U10.L5@144.535,73.48 ; v3(143.9,85.545) U10.B5@144.535,84.91 ; v3(143.94,139.22) U23.H3@143.305,139.855 ; U23.J4@144.575,141.125 v3(143.94,140.49) U23.H3@143.305,139.855 ; v3(145.17,72.845) U10.L6@145.805,73.48 ; v3(145.17,85.545) U10.B6@145.805,84.91 ; U23.K4@145.845,141.125 v3(146.48,140.49) ; U23.K7@145.845,144.935 v3(146.48,145.57) ; U23.K8@145.845,146.205 v3(146.48,146.84) ; U23.K9@145.845,147.475 v3(146.48,148.11) ; U10.L7@147.075,73.48 v3(147.71,72.845) ; U10.K7@147.075,74.75 v3(147.71,74.115) ; U10.D7@147.075,82.37 v3(147.71,83.005) U10.C8@148.345,83.64 148.96,84.255 v3(148.96,84.28) ; U10.C7@147.075,83.64 147.1,83.64 v3(147.72,84.26) ; U10.B7@147.075,84.91 v3(147.71,85.545) ; U23.L4@147.115,141.125 v3(147.75,140.49) ; U23.L5@147.115,142.395 v3(147.75,141.76) ; U23.L6@147.115,143.665 v3(147.75,143.03) ; U23.L7@147.115,144.935 v3(147.75,145.57) ; U23.L8@147.115,146.205 v3(147.75,146.84) ; U23.L9@147.115,147.475 v3(147.75,148.11) ; U10.L8@148.345,73.48 v3(148.98,72.845) ; U10.K8@148.345,74.75 v3(148.98,74.115) ; U10.B8@148.345,84.91 v3(148.98,85.545) ; U10.L9@149.615,73.48 v3(150.25,72.845) ; U10.K9@149.615,74.75 v3(150.25,74.115) ; v3(150.25,80.46) 150.39,80.46 150.885,79.965 U10.F10@150.885,79.83 U10.G10@150.885,78.56 ; v3(150.25,85.545) U10.B9@149.615,84.91 U10.C9@149.615,83.64 149.62,83.64 v3(150.29,84.31) ; U10.J10@150.885,76.02 U10.H10@150.885,77.29 U10.G10@150.885,78.56 ; v3(152.77,79.14) 152.19,78.56 U10.G11@152.155,78.56 U10.G10@150.885,78.56 ; J21.14@159.1,44.05 159.1,42.9 159.3,42.7
  7_int6_(sign) w0.2: v1@65.9,42.9 v1(65.925,42.9)
  2_int1_(gnd) w0.3: v1(19.602,111.975) 20.275,111.975